# Altium PCB PCB.PcbDoc (part 6 of 9)
Units mil, origin at the board's own origin, x right, y up, seen from the top; angles counter-clockwise.
Board outline 4330.71 x 3149.61 mil, 8 copper layers (L1_TOP, L2_GND, L3_SIG, L4_PWR, L5_PWR, L6_SIG, L7_GND, L8_BOT), stack 62.406 mil thick; 660 components, 433 nets, 2602 pads, 1254 vias.
Unrouted connection lines stored in the file: 930.
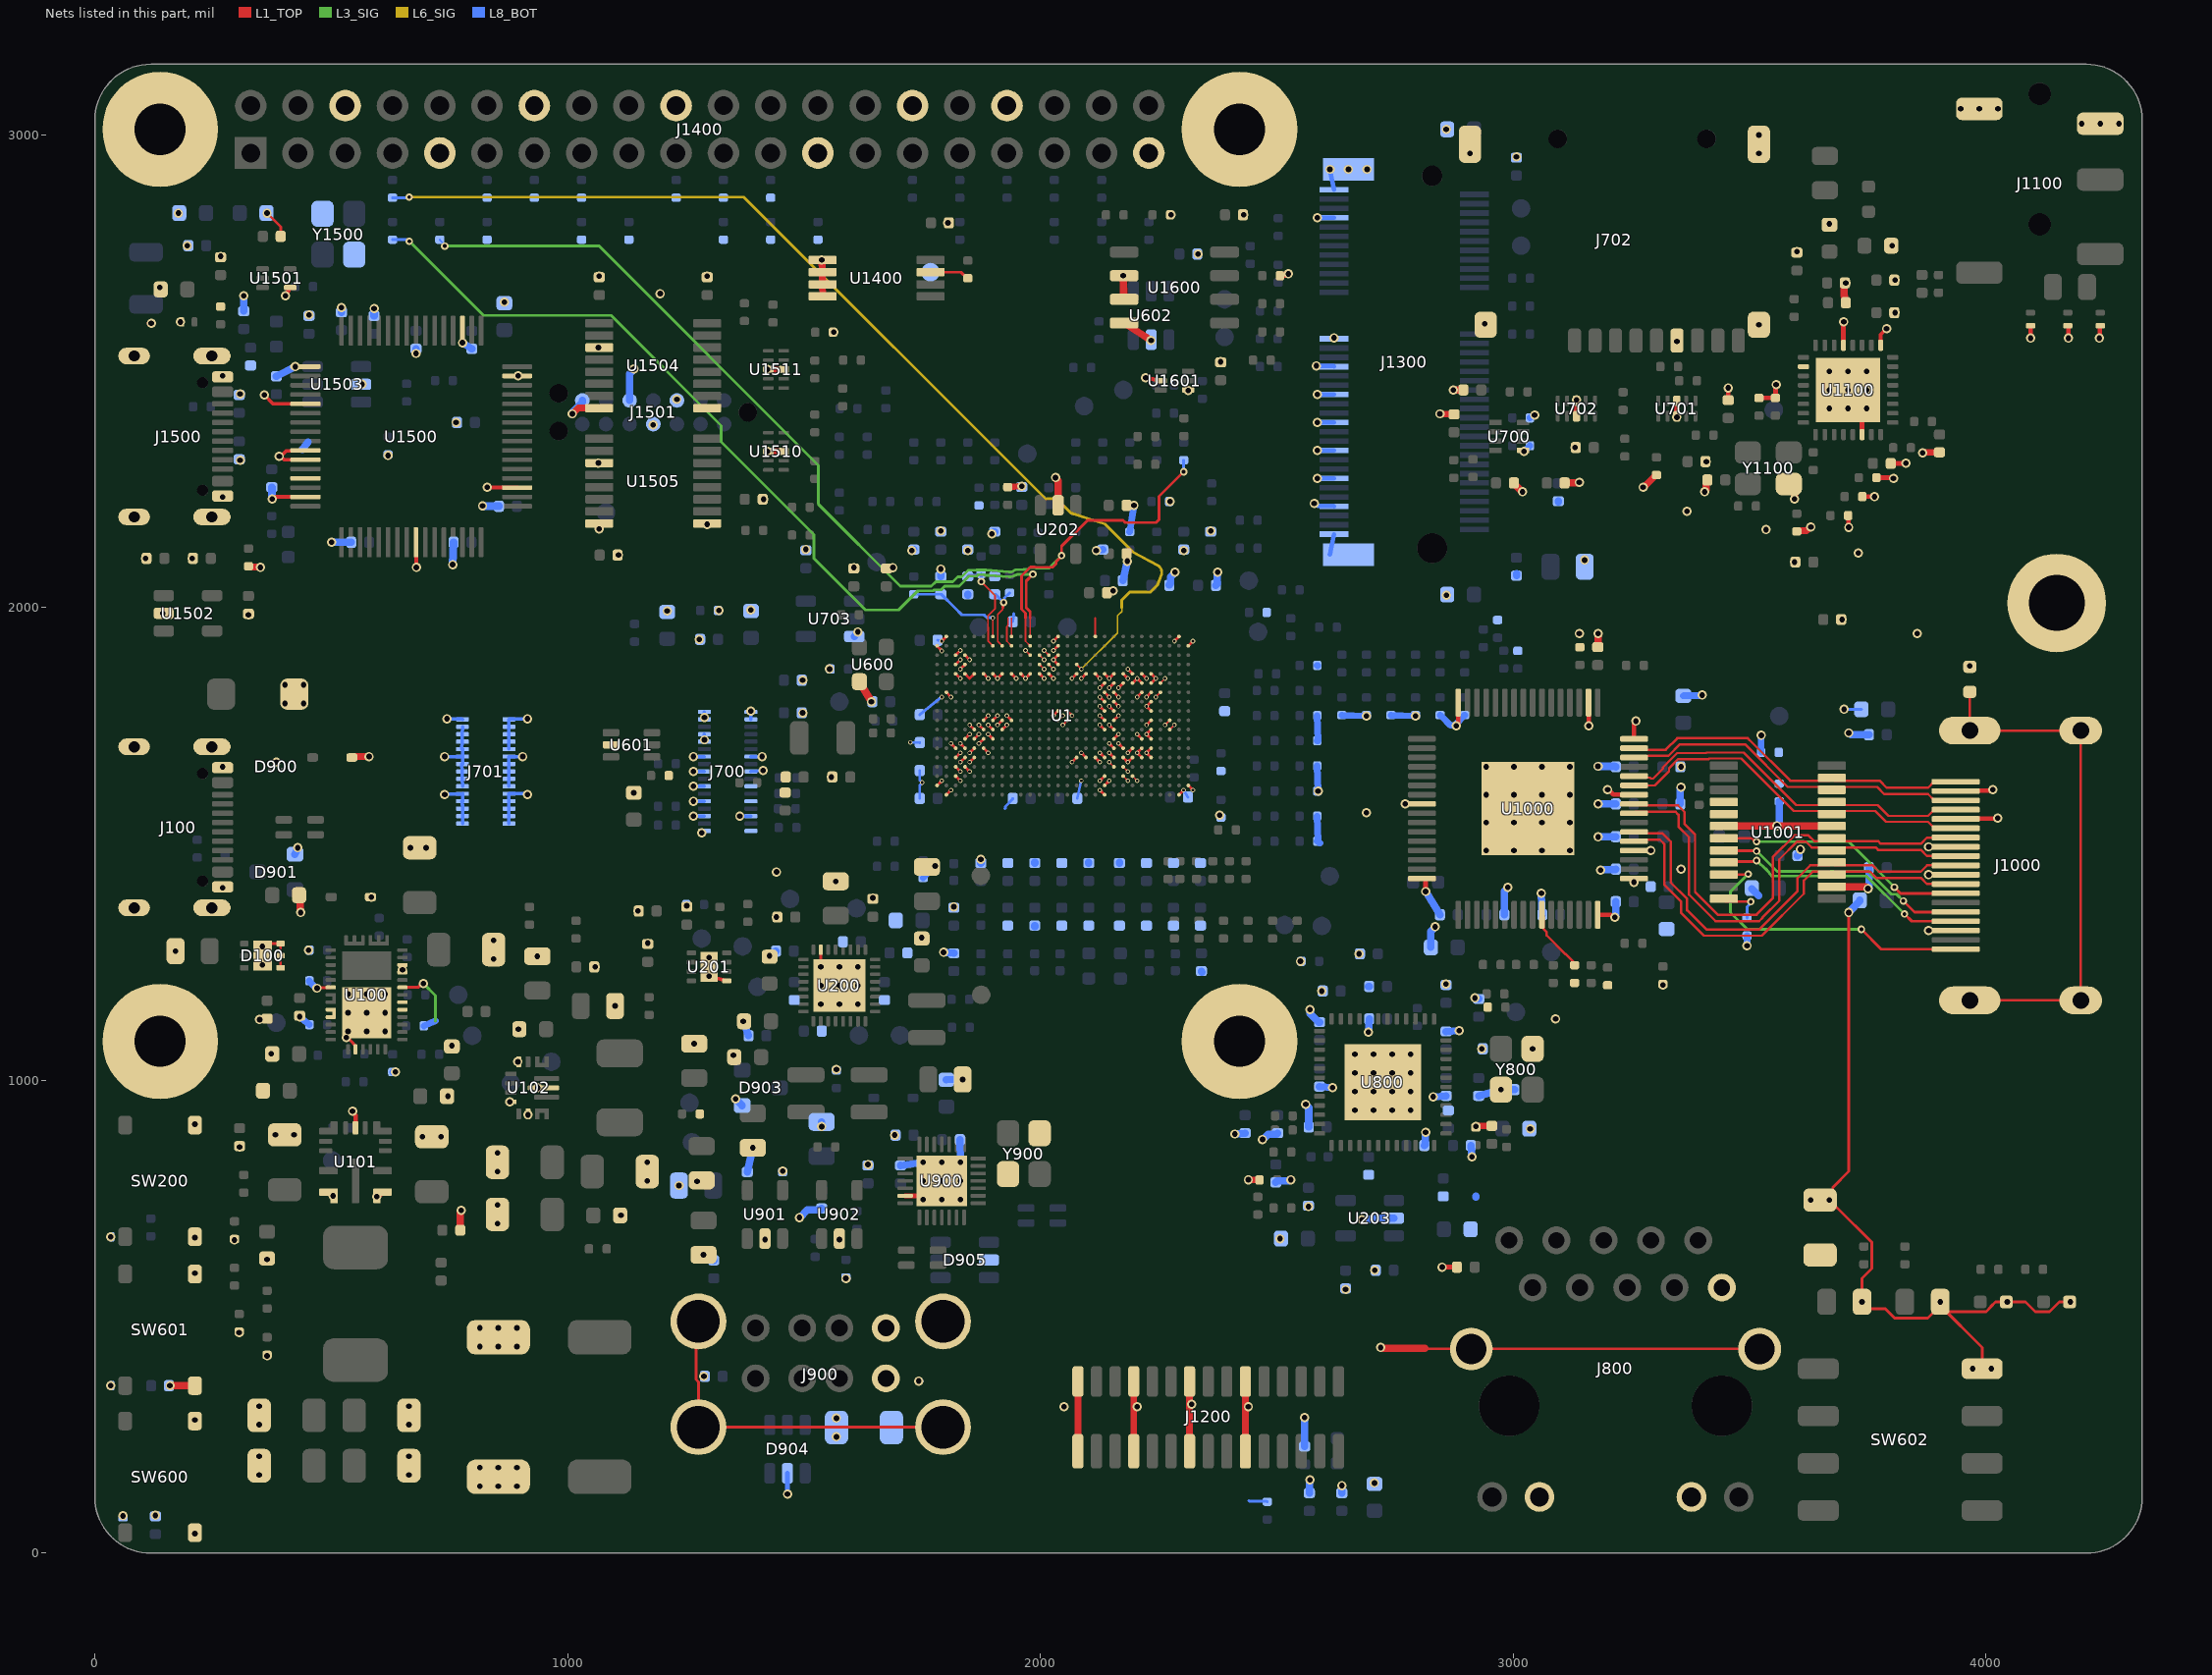
[diagram p9: the nets of this part, all layers, seen from the top]

## Via types
v1: diameter 19.68, hole 11.81, L1_TOP to L8_BOT, 865 vias
v2: diameter 9.84, hole 5.91, L1_TOP to L8_BOT, 246 vias
v3: diameter 15.75, hole 7.87, L1_TOP to L8_BOT, 125 vias
v4: diameter 13.78, hole 7.87, L1_TOP to L8_BOT, 18 vias

## Nets (pads, with @x,y where several pads share a name; then routed paths per layer and width w, separated by ;. In a path a pad name is that pad's centre, name@x,y a point inside that pad or via, vN(x,y) a via of type N, cw(c..) or ccw(c..) an arc to the next point about the centre after c; other vN are vias at no path point) (continued)
GND: C100.2 C101.2 C102.2 C103.2 C104.2 C105.2 C106.2 C107.2 C108.2 C109.2 C110.2 C111.2 C112.2 C113.2 C114.2 C117.2 C118.2 C119.2 C120.2 C121.2 C122.2 C123.2 C124.2 C125.2 C126.2 C127.2 C128.2 C200.2 C201.2 C202.2 C203.2 C204.2 C205.2 C206.2 C207.2 C208.2 C209.2 C210.2 C211.2 C212.2 C213.2 C214.2 C215.2 C216.2 C217.2 C218.2 C219.2 C220.2 C221.2 C222.2 C223.2 C224.2 C225.2 C226.2 C227.2 C228.2 C300.2 C301.2 C302.2 C303.2 C304.2 C305.2 C306.2 C307.2 C308.2 C309.2 C310.2 C311.2 C312.2 C313.2 C314.2 C315.2 C316.2 C317.2 C318.2 C319.2 C320.2 C321.2 C322.2 C323.2 C324.2 C325.2 C326.2 C327.2 C328.2 C329.2 C330.2 C331.2 C332.2 C333.2 C334.2 C335.2 C339.2 C358.2 C359.2 C360.2 C600.2 C601.2 C602.2 C603.2 C604.2 C605.2 C606.2 C607.2 C608.2 C609.2 C700.2 C701.2 C702.2 C703.2 C704.2 C705.2 C710.2 C711.2 C712.2 C713.2 C714.2 C715.2 C800.2 C801.2 C802.2 C803.2 C804.2 C805.2 C806.2 C807.2 C808.2 C809.2 C810.2 C811.2 C812.2 C813.2 C814.2 C815.2 C816.2 C817.2 C818.2 C819.2 C820.2 C821.2 C822.2 C823.2 C824.2 C825.2 C826.2 C830.2 C831.1 C831.2 C900.2 C901.2 C902.2 C903.2 C904.2 C905.2 C906.2 C907.2 C908.2 C909.2 C910.2 C911.2 C912.2 C913.1 C913.2 C1000.2 C1001.2 C1002.2 C1003.2 C1004.2 C1005.2 C1006.2 C1007.2 C1008.2 C1009.2 C1010.2 C1011.2 C1012.2 C1013.2 C1014.2 C1015.2 C1016.2 C1017.2 C1018.2 C1019.2 C1020.2 C1100.2 C1101.2 C1102.2 C1103.2 C1104.2 C1105.2 C1106.2 C1107.2 C1108.2 C1109.2 C1110.2 C1114.2 C1115.2 C1200.2 C1201.2 C1202.2 C1203.2 C1300.2 C1301.2 C1302.2 C1303.2 C1304.2 C1305.2 C1400.2 C1401.2 C1402.2 C1403.2 C1404.2 C1405.2 C1406.2 C1407.2 C1500.2 C1501.2 C1502.2 C1503.2 C1504.2 C1505.2 C1506.2 C1507.2 C1508.2 C1509.2 C1510.2 C1511.2 C1512.2 C1513.2 C1514.2 C1515.2 C1516.2 C1517.2 C1518.2 C1519.2 C1520.2 C1521.2 C1522.2 C1523.2 C1524.2 C1525.2 C1600.2 C1601.2 D100.1 D100.2 D100.3 D100.7 D101.2 D102.2 D103.1 D200.2 D600.2 D601.2 D900.1 D901.1 D903.1 D904.2 D905.2 D1100.2 D1101.2 D1102.2 D1500.2 FB1003.2 H1300.1 H1600.1 H1601.1 H1602.1 H1603.1 J100.A1B12 J100.B1A12 J100.S1 J100.S2 J100.S3 J100.S4 J700.1 J700.3 J700.5 J700.7 J700.9 J700.11 J700.13 J700.14 J700.16 J700.17 J700.18 J700.19 J700.24 J700.26 J700.28 J700.30 J700.32 J700.34 J701.1 J701.2 J701.3 J701.4 J701.5 J701.6 J701.7 J701.8 J701.9 J701.10 J701.11 J701.12 J701.13 J701.14 J701.15 J701.16 J701.17 J701.18 J701.19 J701.20 J701.21 J701.22 J701.23 J701.24 J701.25 J701.26 J701.27 J701.28 J701.29 J701.30 J702.6 J702.10 J702.11 J702.12 J702.13 J800.10 J800.12 J800.13 J800.15 J800.16 J900.4 J900.8 J900.9 J900.10 J900.11 J900.12 J1000.2 J1000.5 J1000.8 J1000.11 J1000.17 J1100.4 J1100.5 J1200.1 J1200.4 J1200.7 J1200.10 J1300.1 J1300.7 J1300.33 J1300.39 J1300.45 J1300.51 J1300.57 J1300.63 J1300.69 J1300.75 J1300.76 J1300.77 J1400.6 J1400.9 J1400.14 J1400.20 J1400.25 J1400.30 J1400.34 J1400.39 J1500.A1B12 J1500.B1A12 J1500.S1 J1500.S2 J1500.S3 J1500.S4 J1501.4 J1501.8 J1501.10 J1501.12 LED1600.2 LED1601.2 LED1602.2 LED1603.2 R101.2 R103.2 R104.2 R105.2 R106.2 R114.2 R115.2 R118.2 R124.2 R206.2 R302.2 R606.2 R611.2 R612.2 R613.2 R621.2 R623.2 R625.2 R627.2 R629.2 R631.2 R633.2 R635.2 R637.2 R639.2 R641.2 R643.2 R645.2 R647.2 R649.2 R712.2 R713.2 R732.2 R812.2 R821.2 R823.2 R904.2 R905.2 R906.2 R907.2 R912.2 R913.2 R1001.2 R1003.2 R1004.2 R1005.2 R1006.2 R1009.2 R1010.2 R1011.2 R1107.2 R1108.2 R1109.2 R1110.2 R1111.2 R1112.2 R1202.2 R1310.2 R1312.2 R1315.2 R1500.2 R1501.2 R1503.2 R1528.2 R1601.2 R1602.2 SW200.3 SW200.4 SW600.3 SW600.4 SW601.3 SW601.4 SW602.4 U1.A2 U1.A14 U1.A27 U1.B1 U1.B14 U1.B28 U1.C3 U1.C4 U1.C14 U1.D3 U1.D4 U1.D14 U1.E3 U1.E4 U1.E5 U1.E6 U1.E7 U1.E8 U1.E9 U1.E10 U1.E11 U1.E12 U1.E13 U1.E16 U1.E17 U1.E18 U1.E19 U1.E20 U1.E21 U1.E22 U1.E23 U1.E24 U1.F19 U1.F20 U1.F21 U1.F22 U1.F23 U1.F24 U1.G2 U1.G19 U1.G20 U1.G23 U1.G24 U1.H19 U1.H20 U1.H24 U1.J14 U1.J15 U1.J19 U1.J20 U1.J24 U1.K6 U1.K7 U1.K8 U1.K9 U1.K14 U1.K15 U1.K19 U1.K20 U1.K24 U1.L5 U1.L6 U1.L7 U1.L8 U1.L19 U1.L20 U1.L24 U1.M4 U1.M5 U1.M6 U1.M7 U1.M20 U1.M23 U1.M24 U1.N3 U1.N4 U1.N5 U1.N6 U1.N20 U1.N21 U1.N22 U1.N23 U1.N24 U1.P3 U1.P4 U1.P5 U1.P16 U1.P17 U1.P18 U1.P19 U1.P20 U1.P21 U1.P22 U1.P23 U1.P24 U1.R3 U1.R4 U1.T3 U1.T19 U1.U1 U1.U19 U1.U28 U1.V2 U1.V19 U1.V27 U100.2 U100.11 U100.12 U100.14 U100.16 U100.17 U100.31 U100.34 U100.35 U100.39 U101.3 U101.9 U101.11 U102.4 U102.6 U102.10 U102.15 U200.15 U200.33 U201.5 U201.9 U202.2 U203.2 U600.2 U601.2 U602.2 U700.5 U701.3 U701.8 U702.3 U702.8 U703.3 U800.49 U900.27 U900.29 U901.2 U902.2 U1000.16 U1000.17 U1000.20 U1000.26 U1000.32 U1000.34 U1000.48 U1000.56 U1000.64 U1000.65 U1001.6 U1001.14 U1001.19 U1100.6 U1100.17 U1100.21 U1100.26 U1100.33 U1400.1 U1400.2 U1400.3 U1400.4 U1500.1 U1500.5 U1500.10 U1500.11 U1500.13 U1500.15 U1500.25 U1500.35 U1500.47 U1500.51 U1501.4 U1502.2 U1503.2 U1504.3 U1504.8 U1504.9 U1505.3 U1505.8 U1505.9 U1510.3 U1510.8 U1511.3 U1511.8 U1600.2 U1600.3 U1600.4 U1601.2 U1601.4 Y800.2 Y800.4 Y900.2 Y900.4 Y1100.2 Y1500.2 Y1500.4 | length 13904.6
  L1_TOP w5.12: 2813.19,433.07 2814.37,431.89 J800.15@2911.61,431.89 J800.16@3521.46,431.89
  L1_TOP w5.91: D100.7@354.33,1263.78 354.33,1272.64 371.06,1289.37 D100.3@392.72,1289.37 D100.2@392.72,1263.78 D100.1@392.72,1238.19 ; v1(364.13,2834.66) 392.91,2805.88 C1502.2@392.91,2785.43 ; J900.11@1276.77,490.16 1271.46,484.84 1271.46,367.09 1276.77,361.77 J900.9@1276.77,266.54 J900.10@1794.09,266.54 ; U1.U1@1781.5,1624.02 v2(1791.34,1633.86) ; U1.B1@1781.5,1919.29 1781.5,1918.9 1791.34,1909.06 v2(1791.34,1908.66) ; v2(1791.34,1929.13) U1.A2@1801.18,1938.98 ; U1.V2@1801.18,1604.33 v2(1811.02,1614.17) ; U1.G2@1801.18,1820.87 v2(1811.02,1811.02) ; v2(1811.02,1712.6) U1.N3@1820.87,1702.76 ; U1.T3@1820.87,1643.7 v2(1830.71,1633.86) ; U1.R3@1820.87,1663.39 v2(1830.71,1653.54) ; U1.P3@1820.87,1683.07 v2(1830.71,1692.91) ; U1.E3@1820.87,1860.24 v2(1830.71,1850.39) ; U1.D3@1820.87,1879.92 v2(1830.71,1889.76) ; U1.C3@1820.87,1899.61 v2(1830.71,1909.45) ; v2(1830.71,1673.23) U1.P4@1840.55,1683.07 ; v2(1830.71,1712.6) U1.N4@1840.55,1702.76 ; v2(1830.71,1870.08) U1.D4@1840.55,1879.92 ; U1.R4@1840.55,1663.39 v2(1850.39,1653.54) ; U1.M4@1840.55,1722.44 v2(1850.39,1732.28) ; U1.E4@1840.55,1860.24 1850.39,1850.39 U1.E5@1860.24,1860.24 ; U1.C4@1840.55,1899.61 v2(1850.39,1889.76) ; v2(1850.39,1673.23) U1.P5@1860.24,1683.07 ; v2(1850.39,1692.91) U1.N5@1860.24,1702.76 ; v2(1850.39,1751.97) U1.L5@1860.24,1742.13 ; U1.M5@1860.24,1722.44 v2(1870.08,1732.28) ; v2(1870.08,1712.6) U1.M6@1879.92,1722.44 ; v2(1870.08,1751.97) U1.L6@1879.92,1742.13 ; U1.N6@1879.92,1702.76 v2(1889.76,1692.91) ; U1.K6@1879.92,1761.81 v2(1889.76,1771.65) ; U1.E6@1879.92,1860.24 v2(1889.76,1850.39) ; v2(1889.76,1732.28) U1.M7@1899.61,1722.44 ; v2(1889.76,1751.97) U1.L7@1899.61,1742.13 ; U1.K7@1899.61,1761.81 v2(1909.45,1771.65) ; U1.E7@1899.61,1860.24 v2(1909.45,1850.39) U1.E8@1919.29,1860.24 ; v2(1909.45,1751.97) U1.K8@1919.29,1761.81 ; U1.L8@1919.29,1742.13 v2(1929.13,1751.97) ; v2(1929.13,1771.65) U1.K9@1938.98,1761.81 ; U1.E9@1938.98,1860.24 v2(1948.82,1850.39) ; U1.E10@1958.66,1860.24 v2(1968.5,1850.39) U1.E11@1978.35,1860.24 ; U1.E12@1998.03,1860.24 v2(2007.87,1850.39) ; U1.E13@2017.72,1860.24 v2(2027.56,1850.39) ; v2(2027.56,1771.65) U1.J14@2037.4,1781.5 ; v2(2027.56,1909.45) U1.B14@2037.4,1919.29 ; v2(2027.56,1929.13) U1.A14@2037.4,1938.98 ; U1.K14@2037.4,1761.81 v2(2047.24,1771.65) ; U1.D14@2037.4,1879.92 v2(2027.56,1889.76) U1.C14@2037.4,1899.61 ; v2(2047.24,1751.97) U1.K15@2057.09,1761.81 ; U1.J15@2057.09,1781.5 v2(2066.93,1771.65) ; v2(2066.93,1673.23) U1.P16@2076.77,1683.07 ; v2(2066.93,1850.39) U1.E16@2076.77,1860.24 ; v2(2086.61,1692.91) U1.P17@2096.46,1683.07 ; v2(2086.61,1850.39) U1.E17@2096.46,1860.24 ; U1.P18@2116.14,1683.07 v2(2125.98,1673.23) ; U1.E18@2116.14,1860.24 v2(2125.98,1850.39) ; v2(2125.98,1614.17) U1.V19@2135.83,1604.33 ; v2(2125.98,1633.86) U1.T19@2135.83,1643.7 ; v2(2125.98,1692.91) U1.P19@2135.83,1683.07 ; v2(2125.98,1751.97) U1.L19@2135.83,1742.13 ; v2(2125.98,1771.65) U1.K19@2135.83,1761.81 ; v2(2125.98,1791.34) U1.J19@2135.83,1781.5 ; v2(2125.98,1811.02) U1.H19@2135.83,1801.18 ; v2(2125.98,1830.71) U1.F19@2135.83,1840.55 ; U1.U19@2135.83,1624.02 v2(2145.67,1633.86) ; U1.G19@2135.83,1820.87 v2(2145.67,1811.02) ; U1.E19@2135.83,1860.24 v2(2145.67,1850.39) U1.E20@2155.51,1860.24 ; v2(2145.67,1692.91) U1.P20@2155.51,1683.07 ; v2(2145.67,1712.6) U1.N20@2155.51,1702.76 ; v2(2145.67,1751.97) U1.L20@2155.51,1742.13 ; v2(2145.67,1791.34) U1.J20@2155.51,1781.5 ; v2(2145.67,1830.71) U1.F20@2155.51,1840.55 ; U1.M20@2155.51,1722.44 v2(2165.35,1732.28) ; U1.K20@2155.51,1761.81 v2(2165.35,1771.65) ; U1.H20@2155.51,1801.18 v2(2165.35,1791.34) ; U1.G20@2155.51,1820.87 v2(2165.35,1811.02) ; v2(2165.35,1712.6) U1.N21@2175.2,1702.76 ; v2(2165.35,1830.71) U1.F21@2175.2,1840.55 ; U1.P21@2175.2,1683.07 v2(2185.04,1673.23) U1.P22@2194.88,1683.07 ; U1.E21@2175.2,1860.24 v2(2185.04,1850.39) ; v2(2185.04,1692.91) U1.N22@2194.88,1702.76 ; v2(2185.04,1870.08) U1.E22@2194.88,1860.24 ; U1.F22@2194.88,1840.55 v2(2204.72,1850.39) U1.F23@2214.57,1840.55 ; v2(2204.72,1732.28) U1.M23@2214.57,1722.44 ; v2(2204.72,1811.02) U1.G23@2214.57,1820.87 ; U1.P23@2214.57,1683.07 v2(2204.72,1692.91) U1.N23@2214.57,1702.76 ; U1.E23@2214.57,1860.24 v2(2224.41,1850.39) ; v2(2224.41,1751.97) U1.K24@2234.25,1761.81 ; v2(2224.41,1811.02) U1.G24@2234.25,1820.87 ; U1.P24@2234.25,1683.07 v2(2224.41,1692.91) U1.N24@2234.25,1702.76 ; U1.M24@2234.25,1722.44 v2(2224.41,1732.28) U1.L24@2234.25,1742.13 ; U1.J24@2234.25,1781.5 v2(2224.41,1791.34) U1.H24@2234.25,1801.18 ; U1.F24@2234.25,1840.55 v2(2244.09,1850.39) U1.E24@2234.25,1860.24 ; v2(2283.46,1929.13) U1.A27@2293.31,1938.98 ; U1.V27@2293.31,1604.33 v2(2303.15,1614.17) ; U1.U28@2312.99,1624.02 v2(2322.83,1614.17) ; U1.B28@2312.99,1919.29 v2(2322.83,1929.13) ; v1(3710,1355) 3710,807.64 3676.12,773.76 3676.12,767.99 3655.18,747.05 C831.2@3649.41,747.05 3665.29,731.17 3685.43,731.17 3758.86,657.74 3758.86,602.1 3738.19,581.43 v1(3738.19,531.5) 3752.95,516.73 3787.32,516.73 3807,497.05 3876.97,497.05 3903.54,523.62 3992.13,435.04 SW602.4@3992.13,390.16 ; v1(3903.54,531.5) 3903.54,527.35 3920.07,510.83 4000.79,510.83 4010.73,520.77 4010.73,521.55 4020.67,531.5 v1(4045.28,531.5) 4083.9,531.5 4104.57,510.83 4134.64,510.83 4155.31,531.5 v1(4179.13,531.5)
  L1_TOP w6.3: D900.1@383.86,1669.29 v1(383.86,1673.23) ; v1(470,1195) 471.06,1196.06 498.23,1196.06 U100.31@499.02,1196.85 ; v1(531.57,1090.44) 534.57,1090.44 546.46,1078.55 546.46,1077.56 550.39,1073.62 550.39,1066.73 U100.2@551.18,1065.94 ; U100.14@650.59,1196.85 683.5,1196.85 691.38,1204.72 v1(695,1204.72) ; U100.16@650.59,1228.35 v1(650.59,1234.25) U100.17@650.59,1244.09 ; v1(1535.43,1240.16) U200.15@1535.43,1276.57
  L1_TOP w7.87: v1(358.27,2450) 377.17,2431.1 U1500.5@445.37,2431.1 ; v1(375,2230) 378.2,2230 382.45,2234.25 U1500.15@445.37,2234.25 ; v1(390,2320) v1@393.2,2320 ; v1(423.7,2509.84) U1500.1@445.37,2509.84 ; U1500.11@445.37,2312.99 400.2,2312.99 v1@393.2,2320 ; U1500.10@445.37,2332.68 444.39,2331.69 404.89,2331.69 v1@393.2,2320 ; U1500.25@679.13,2138.29 679.57,2137.85 679.57,2085.43 v1(680,2085) ; v1(777.56,2560.51) U1500.51@777.56,2586.12 ; v1(830,2255) 830.53,2254.47 892.68,2254.47 U1500.35@893.21,2253.94 ; v1(877.95,954.72) U102.4@879.92,954.72 ; U1500.47@893.21,2490.16 v1(895.2,2490.16) ; v1(894.68,1039.37) U102.15@896.65,1039.37 ; v1(916.34,927.17) U102.6@916.34,929.13 ; v1(937.01,984.25) U102.10@948.82,984.25 ; v1(1299.21,1220.47) U201.5@1336.61,1210.63 ; U1100.17@3777.56,2555.12 3777.56,2577.56 v1(3790,2590)
  L1_TOP w9.45: v1(181.1,2604.33) D1500.2@183.07,2604.33 ; v1(403.15,2659.45) U1501.4@412.99,2677.16 ; v1(545,935) 545,932.23 551.18,926.05 U101.3@551.18,899.61 ; v1(2222.83,2486.22) U1601.2@2254.33,2480.32 ; U1601.4@2312.6,2460.63 v1(2313.02,2459.11) ; v1(2771.65,1584.65) U1000.56@2807.09,1584.65 ; v1(2880,1750) 2880,1752.77 2883.86,1756.63 U1000.48@2883.86,1799.21 ; U700.5@3021.26,2332.68 v1(3023.23,2330.71) ; U1000.34@3159.45,1799.21 3159.72,1798.94 3159.72,1750.28 v1(3160,1750) ; U1000.16@3179.13,1350.39 3206.84,1350.39 3212.23,1345 v1(3215,1345) ; v1(3200,1615) 3201.54,1615 3212.2,1604.33 U1000.26@3255.91,1604.33 ; v1(3255.91,1419.29) U1000.17@3255.91,1427.17 ; U1000.20@3255.91,1486.22 v1(3291.34,1486.22) ; U1000.32@3255.91,1722.44 3255.91,1753.14 3260,1757.23 v1(3260,1760) ; v1(3879.13,1316.93) J1000.17@3936.22,1316.93 ; v1(3879.13,1435.04) J1000.11@3936.22,1435.04 ; v1(3879.13,1494.09) J1000.8@3936.22,1494.09 ; J1000.5@3936.22,1553.15 3937.15,1554.07 4024.07,1554.07 v1(4025,1555) ; J1000.2@3936.22,1612.2 3937.4,1613.39 4013.39,1613.39 v1(4015,1615) ; D1102.2@4094.49,2596.46 4094.74,2596.2 4094.74,2570.26 v1(4095,2570) ; D1101.2@4173.23,2596.46 4173.82,2596.46 4175,2595.28 v1(4175,2570) ; v1(4240,2570) 4241.06,2571.06 4241.06,2595.39 D1100.2@4242.13,2596.46
  L1_TOP w10: U900.27@1714.08,755.91 1744.09,755.91 v1(1751.97,748.03) ; U1000.64@2807.09,1427.17 2814.06,1427.17 2814.96,1426.26 v1(2814.96,1399.61) ; v1(2850,605) C830.2@2881.1,605 ; C1109.2@3455,2438.9 v1(3455,2465) ; R1107.2@3520,2443.7 R1108.2@3555,2443.7 3555,2470.36 v1(3556.5,2471.87) ; U1100.21@3698.82,2555.12 3698.82,2598.82 3700,2600 3700,2604.47 v1(3699.53,2604.95) ; v1(3708.66,2460.63) 3738.19,2431.1 U1100.6@3738.19,2366.14 ; R1110.2@3708.7,2195 3709.35,2194.35 3709.35,2170.65 v1(3710,2170) ; R1111.2@3738.7,2235 3763.84,2235 v1(3764.22,2234.61) ; R1112.2@3768.7,2275 3803.22,2275 v1(3804.63,2273.59) ; C1107.2@3798.9,2305 3830.34,2305 v1(3830.67,2305.33)
  L1_TOP w12.6: U101.9@494.09,763.78 v1(503.94,755.91) U101.9@505.91,755.91 ; U101.11@596.46,755.91 v1(596.46,753.94) 597.42,754.74 U101.11@608.27,763.78 ; v1(1422.56,2330.71) U1510.8@1457.38,2330.71 ; v1(1422.56,2503.94) U1511.3@1424.51,2503.94 U1511.8@1457.38,2503.94 ; v1(2845,2410) 2845.55,2409.45 2874.45,2409.45 C710.2@2875,2408.9 ; v1(3130.91,2338.58) C713.2@3133.37,2341.04 ; U702.8@3133.37,2404.33 U702.8@3133.86,2404.82 ; U702.8@3133.86,2404.82 v1(3133.86,2439.65) ; v1(3346.46,2402.87) U701.8@3346.46,2437.7
  L1_TOP w14.17: v1@117.13,2601.38 v1(119.09,2601.38) ; v1(295.28,662.4) R118.2@295.28,664.37 ; v1(305.12,466.54) R114.2@305.12,468.5 ; R1501.2@324.8,2087.6 326.35,2086.05 348.95,2086.05 v1(350,2085) ; v1(364.17,417.32) R115.2@364.17,419.29 ; D101.2@543.5,1683.07 545.28,1684.84 551.58,1684.84 551.73,1685 v1(580,1685) ; D102.2@582.87,1387.8 v1(584.84,1387.8) ; v1(1010,2410) 1022.24,2422.24 U1504.8@1066.93,2422.24 ; v1(1064.96,2306.1) U1505.3@1066.93,2306.1 ; v1(1064.96,2550.2) U1504.3@1066.93,2550.2 ; v1(1066.93,2166.34) U1505.8@1066.93,2178.15 ; v1(1195.87,2664.37) v1@1197.83,2664.37 ; v1(1295.28,2176.18) U1505.9@1295.28,2178.15 ; v1@1439.96,1440.94 v1(1441.93,1440.94) ; U1400.4@1539.37,2658.46 1538.71,2684.04 1538.06,2709.61 v1(1537.4,2735.24) v1(1537.4,2735.24) ; U1400.3@1539.37,2684.05 1538.39,2709.61 v1(1537.4,2735.24) v1(1537.4,2735.24) ; U1400.2@1539.37,2709.65 1537.41,2735.09 v1(1537.4,2735.24) ; U1400.1@1539.37,2735.24 v1(1537.4,2735.24) ; R1528.2@1561.34,2582.68 v1(1563.31,2582.68) ; R206.2@1931.1,2254.92 v1(1960.63,2257.09) ; J1200.1@2079.41,215.43 J1200.1@2079.41,363.07 ; J1200.4@2197.52,215.43 J1200.4@2197.52,363.07 ; R1601.2@2274.61,2830.91 v1(2276.57,2830.91) ; J1200.7@2315.63,215.43 J1200.7@2315.63,363.07 ; J1200.10@2433.74,215.43 J1200.10@2433.74,363.07 ; v1(2440,790) 2440.32,789.68 2463.27,789.68 R823.2@2463.58,789.37 ; R1602.2@2506.89,2702.16 v1(2524.61,2706.1) ; v1(2921.26,902.56) 2922.6,903.9 C802.2@2955,903.9 ; v1(3275,2255) 3276.05,2256.05 3277.9,2256.05 3302.36,2280.51 R732.2@3303.35,2280.51 ; v1(3316.93,1201.77) R1003.2@3316.93,1203.74 ; v1(3368.11,2203.74) v1@3368.11,2205.71 ; R1109.2@3600,2161.3 3601.77,2163.07 3620.95,2163.07 3628.51,2170.63 v1(3630,2170.63) ; v1@3630,2172.6 v1(3630,2170.63) ; v1@3630.07,2170.63 v1(3630,2170.63) ; v1(3730,2115.63) v1@3730,2117.6 ; v1@3866.14,2325.59 3867.63,2325.59 3870.62,2328.58 C1108.2@3901.97,2328.58
  L1_TOP w15.75: v1(107.09,2104.33) C1503.2@109.06,2104.33 ; v1(137.01,2677.17) C1500.2@138.98,2673.23 ; v1(143.7,1988.19) U1502.2@145.67,1988.19 ; v1(158.66,354.33) SW601.3@211.61,354.33 ; v1(205.51,2104.33) C1505.2@207.48,2104.33 ; v1(211.61,41.34) SW600.3@211.61,43.31 ; SW600.4@211.61,279.53 v1(211.61,281.5) ; SW601.4@211.61,590.55 v1(211.61,592.52) ; v1(211.61,667.32) SW200.3@211.61,669.29 ; SW200.4@211.61,905.51 v1(211.61,907.48) ; C1501.2@265.75,2741.34 v1(265.75,2743.31) ; v1(270.08,1407.48) J100.B1A12@270.08,1409.45 ; J100.A1B12@270.08,1661.42 v1(270.08,1663.39) ; v1(270.08,2234.25) J1500.B1A12@270.08,2236.22 ; J1500.A1B12@270.08,2488.19 v1(270.08,2490.16) ; v1(306.1,859.06) C113.2@306.1,861.02 ; v1(324.8,1985.04) C1504.2@324.8,1987.01 ; v1(348.43,1128.74) C103.2@364.17,1130.71 ; v1(364.17,621.26) C110.2@364.17,623.23 ; v1(373.23,1056.1) C105.2@375.2,1056.1 ; C101.2@431.89,1391.73 434.25,1389.38 434.25,1355.75 v1(435,1355) ; v1(433.07,1134.65) C102.2@433.07,1136.61 ; C112.2@744.88,966.54 v1(746.85,966.54) ; C106.2@755,1071.69 v1(755,1073.66) ; C114.2@772.83,683.07 772.83,721.77 775,723.93 v1(775,725) ; v1(895.87,1108.27) C123.2@897.83,1108.27 ; C124.2@1056.3,1240.16 v1(1058.27,1240.16) ; C1522.2@1066.93,2699.02 v1(1066.93,2700.98) ; C1524.2@1105.51,2111.22 v1(1107.48,2111.22) ; C128.2@1111.02,714.57 v1(1112.99,714.57) ; v1(1148.43,1358.27) C221.2@1150.39,1358.27 ; C224.2@1169.29,1288.58 v1(1169.29,1290.55) ; C222.2@1251.97,1367.32 v1(1251.97,1369.29) ; v1(1273.62,786.61) C213.2@1283.47,788.58 ; C1523.2@1295.28,2699.02 v1(1295.28,2700.98) ; v1(1350.59,1053.15) C207.2@1352.56,1049.21 ; v1(1371.26,1125) C202.2@1373.23,1125 ; C1525.2@1412.6,2229.33 v1(1414.57,2229.33) ; v1(1417.32,663.39) U901.2@1417.32,665.35 ; C203.2@1427.16,1261.61 v1(1427.17,1263.58) ; v1(1441.73,1345.47) C208.2@1443.7,1345.47 ; v1(1557.87,1641.73) C602.2@1559.84,1641.73 ; v1(1574.8,663.39) U902.2@1574.8,665.35 ; C601.2@1605.32,2082.87 v1(1605.32,2084.84) ; U600.2@1617.13,1843.5 v1(1642.52,1801.18) ; C204.2@1645.67,1384.05 v1(1645.67,1386.02) ; C600.2@1674.21,2082.87 v1(1687.99,2084.84) ; C200.2@1749.02,1300 v1(1749.02,1301.97) ; C211.2@1759.84,1451.57 v1(1777.56,1453.54) ; v1(1804.33,2813.98) C1404.2@1806.3,2813.98 ; v1(2032.02,2275.04) 2032.02,2273.97 2037.4,2268.59 2037.4,2222.44 U202.2@2039.96,2219.88 ; C300.2@2140.94,2031.5 2140.94,2032.24 2143.7,2034.99 2153.19,2034.99 v1(2153.94,2035.75) ; U1600.4@2177.17,2602.16 v1(2234.25,2564.96) ; U1600.3@2177.17,2652.16 2175.2,2702.09 v1(2175.2,2702.17) U1600.2@2177.17,2702.16 ; C226.2@2182.28,2114.17 v1(2184.25,2098.43) ; C225.2@2182.28,2216.53 v1(2198.03,2216.54) ; C1601.2@2381.5,2518.9 v1(2381.5,2520.16) ; C1600.2@2428.35,2830.91 v1(2430.32,2830.91) ; v1(2720,435) 2721.07,435 2722.99,433.07 2813.19,433.07 ; v1(2873.23,2460.63) C712.2@2894.88,2460.63 ; v1(2939.96,2600.39) J702.11@2941.93,2598.43 ; C711.2@3001.57,2263.78 3001.57,2262.6 3019.17,2245 v1(3020,2245) ; C715.2@3109.05,2263.78 3109.67,2264.39 3139.39,2264.39 v1(3140,2265) ; C1004.2@3179.13,1916.54 3179.57,1916.97 3179.57,1944.57 v1(3180,1945) ; v1(3346.65,2562.99) J702.6@3346.65,2564.96 ; v1(3405,2245) 3405,2246.07 3408.35,2249.41 3408.35,2267.24 C1110.2@3411.1,2270 ; C714.2@3406.89,2309.05 v1(3408.86,2309.06) ; U1001.6@3445.83,1537.8 v1@3559.17,1537.8 ; v1(3558.33,1538.64) v1@3559.17,1537.8 ; Y1100.2@3583.31,2261.54 3595,2249.84 v1(3595,2230) ; v1(3595.28,2096.46) C1115.2@3597.24,2096.46 ; C1104.2@3600.39,2751.18 v1(3600.39,2753.15) ; C1106.2@3669.29,2809.84 v1(3669.29,2811.81) ; U1001.14@3674.17,1409.84 3745.46,1409.84 3749.62,1405.69 v1(3750.69,1405.69) ; U1001.19@3674.17,1537.8 v1@3559.17,1537.8 ; C1114.2@3693.9,1975 v1(3695.87,1975) ; C1101.2@3703.9,2645 3701.14,2647.76 3701.14,2658.86 3700,2660 3700,2683.07 v1(3703.94,2687.01) ; C1100.2@3800,2765.75 v1(3801.97,2765.75) ; C1103.2@3806.3,2624.02 v1(3808.27,2624.02) ; C1105.2@3806.3,2692.91 v1(3808.27,2692.91) ; v1@3866.14,2325.59 v1(3866.14,2327.56) ; FB1003.2@3966.14,1875 v1(3966.14,1876.97)
  L3_SIG w5.91: v1(695,1204.72) 720.47,1179.25 720.47,1125.79
  L8_BOT w5.91: v2(1725,1715) 1725.22,1714.78 1744.67,1714.78 C319.2@1744.88,1714.57 ; C339.2@1744.88,1596.46 1744.88,1623.82 1750,1628.93 v2(1750,1630) 1750,1630.16 1744.88,1635.28 C318.2@1744.88,1655.51 ; C320.2@1744.88,1773.62 v2(1791.34,1811.02) ; C313.2@1782.68,1931.1 v2(1791.34,1929.13) ; 1925,1575 1925.75,1575.75 1925.75,1579.3 1941.73,1595.28 C302.2@1941.73,1596.46 ; C329.2@1941.73,1970.47 1943.6,1987.28 ; C303.2@2077.95,1596.46 v2(2086.61,1633.86) ; v2(2303.15,1614.17) C315.2@2312.2,1599.21 ; v1(2379.2,1561.02) 2381.89,1558.33 R912.2@2381.89,1556.1 ; 2440.94,111.22 2442.2,109.96 2478.74,109.96 R1202.2@2480,108.7 ; v1(3700,1785) C1016.2@3736.65,1785
  L8_BOT w7.24: v1(740,1605) 740.94,1605.94 777.21,1605.94 J701.5@777.56,1606.3 J701.4@777.56,1590.55 777.13,1590.55 J701.4@777.07,1590.49 ; v1(740,1685) J701.10@777.52,1685 ; v1(745,1765) 745.61,1764.39 776.95,1764.39 J701.15@777.56,1763.78 ; J701.9@776.08,1669.24 776.58,1653.51 777.07,1637.78 J701.6@777.56,1622.05 ; J701.11@776.08,1700.83 776.58,1716.57 777.07,1732.3 J701.14@777.56,1748.03 ; J701.4@776.22,1589.65 J701.4@777.07,1590.49 ; 776.81,1582.46 J701.4@777.07,1590.49 ; J701.4@777.07,1590.57 J701.4@777.07,1590.49 ; J701.1@777.56,1543.31 J701.2@777.56,1559.05 J701.3@777.56,1574.8 ; J701.3@777.56,1574.8 777.56,1582.44 ; J701.9@777.56,1669.29 J701.10@777.56,1685.04 J701.10@777.52,1685 ; J701.11@777.56,1700.79 J701.10@777.56,1685.04 J701.10@777.52,1685 ; J701.30@875.98,1543.31 J701.27@875.98,1590.55 J701.26@875.98,1606.3 913.7,1606.3 v1(915,1605) ; J701.25@875.98,1622.05 J701.23@875.98,1653.54 J701.22@875.98,1669.29 J701.21@875.98,1685.04 ; J701.21@875.98,1685.04 v1(905,1685) ; J701.20@875.98,1700.79 J701.17@875.98,1748.03 J701.16@875.98,1763.78 876.89,1764.68 893.98,1764.68 894.29,1765 v1(915,1765) ; v1(1265.75,1559.06) J700.3@1289.37,1559.05 ; v1(1265.75,1590.55) J700.5@1289.37,1590.55 ; v1(1265.75,1622.05) J700.7@1289.37,1622.05 ; v1(1265.75,1653.54) J700.9@1289.37,1653.54 ; v1(1265.75,1685.04) J700.11@1289.37,1685.04 ; v1(1283.46,1523.62) J700.1@1289.37,1527.56 ; J700.13@1289.37,1716.54 v1(1289.37,1720.47) J700.14@1289.37,1732.28 ; J700.16@1289.37,1763.78 v1(1289.37,1767.72) J700.17@1289.37,1779.53 ; v1(1364.17,1559.06) J700.32@1387.8,1559.05 ; J700.26@1387.8,1653.54 v1(1413.39,1655.51) ; J700.24@1387.8,1685.04 v1(1411.42,1685.04) ; J700.19@1387.8,1763.78 v1(1387.8,1781.5)
  L8_BOT w9.45: v1(33.46,354.33) D601.2@35.43,354.33 ; v1(33.46,669.29) D200.2@35.43,669.29 ; D600.2@59.06,72.83 v1(59.06,78.74) ; v1(2579.26,2220.74) 2582.03,2220.74 2587.02,2215.75 2620.08,2215.75 J1300.69@2621.26,2214.57 ; v1(2583.78,2511.73) 2584.73,2510.79 2620.31,2510.79 J1300.39@2621.26,2509.84 ; v1(2585.83,2273.62) J1300.63@2621.26,2273.62 ; v1(2585.83,2332.68) J1300.57@2621.26,2332.68 ; v1(2585.83,2391.73) J1300.51@2621.26,2391.73 ; v1(2585.83,2450.79) J1300.45@2621.26,2450.79 ; v1(2585.83,2824.8) J1300.7@2621.26,2824.8 ; J1300.77@2612.4,2112.2 2613.98,2119.93 J1300.75@2621.26,2155.51 ; v1(2612.4,2927.17) 2613.98,2919.44 J1300.1@2621.26,2883.86 ; J1300.33@2621.26,2568.9 v1(2621.26,2570.87)
  L8_BOT w10: v1(1465,125) D904.2@1465,168.82
  L8_BOT w14.17: v1(433.07,1134.65) R106.2@453.74,1118.11 ; v1(451.77,1275.59) R104.2@453.74,1275.59 ; R105.2@453.74,1210.63 453.74,1209.65 467.33,1196.05 468.95,1196.05 v1(470,1195) ; v1(620.08,2321.85) R1503.2@620.08,2323.82 ; R101.2@629.92,1017.72 635.19,1017.72 v1(635.73,1018.25) ; R103.2@695.87,1115.16 720.47,1125.79 ; R712.2@1250.98,1372.05 v1(1251.97,1369.29) ; R713.2@1317.91,1994.09 v1(1319.88,1994.09) ; R913.2@1454.72,806.1 v1(1454.72,808.07) ; v1(1554.13,1870.08) R613.2@1556.1,1870.08 ; R906.2@1568.7,1021.14 v1(1568.7,1023.11) ; v1(1588.58,581.22) R907.2@1588.58,583.19 ; R904.2@1751.97,1428.15 v1(1777.56,1453.54) ; R1310.2@2188.98,2160.43 v1(2198.03,2216.54) ; R905.2@2272.64,2224.41 v1(2274.61,2224.41) ; v1(2550.2,1251.97) R821.2@2552.17,1251.97 ; R621.2@2585.63,1505.91 R621.2@2587.6,1505.91 ; R623.2@2585.63,1559.05 2587.6,1505.98 R621.2@2587.6,1505.91 ; R625.2@2585.63,1612.2 v1(2587.6,1612.2) 2587.6,1612.28 R645.2@2585.63,1665.35 ; R647.2@2585.63,1718.5 2587.6,1718.5 2587.6,1718.58 R649.2@2585.63,1771.65 ; R627.2@2585.63,1877.95 2586.33,1877.26 R627.2@2586.9,1877.26 ; R621.2@2591.78,1501.72 R621.2@2587.6,1505.91 ; R643.2@2637.8,1772.64 2689.69,1770.67 v1(2689.76,1770.67) R641.2@2689.76,1772.64 ; R639.2@2741.73,1772.64 2793.63,1770.67 v1(2793.7,1770.67) R637.2@2793.7,1772.64 ; R635.2@2845.67,1772.64 2847.44,1770.87 2848.42,1770.87 2868.24,1751.05 2878.95,1751.05 v1(2880,1750) 2881.05,1751.05 2881.05,1756.05 2894.88,1769.88 2894.88,1770.87 2896.65,1772.64 R633.2@2897.64,1772.64 ; v1(3023.23,2330.71) R1312.2@3035.63,2342.52 ; R1315.2@3035.63,2401.57 v1(3045.47,2407.48) ; C1010.2@3360,1813.35 3360.83,1814.17 3399.17,1814.17 v1(3400,1815) ; v1(3495,1285) R1009.2@3495,1306.3 ; R1011.2@3524.61,1693.9 3524.8,1694.09 3524.8,1729.8 v1(3525,1730)
  L8_BOT w15.75: C606.2@127.95,77.95 v1(127.95,79.92) ; C607.2@156.69,354.33 v1(158.66,354.33) ; v1(176.38,2834.65) C1405.2@178.35,2834.65 ; v1(195.67,2765.75) C1407.2@197.64,2765.75 ; C1518.2@305.12,2313.78 v1(307.09,2311.81) ; C1517.2@305.12,2450 v1(307.09,2451.97) ; C1520.2@314.96,2627.17 v1(315,2660) ; C1507.2@374.02,2254.72 374.51,2254.23 374.51,2230.49 v1(375,2230) ; C1516.2@383.86,2489.37 v1(423.7,2509.84) ; D901.1@423.23,1478.35 v1(429.13,1492.13) ; 438.98,2334.65 450.79,2350.39 ; C1519.2@452.76,2617.32 v1(452.76,2619.29) ; v1(500.79,2138.27) C1511.2@542.13,2138.27 ; C1509.2@521.65,2624.72 v1(521.65,2634.57) ; U1503.2@562.99,2472.44 v1(564.96,2472.44) ; C1521.2@590.55,2617.32 v1(590.55,2633.07) ; v1(679.13,2537.72) C1514.2@679.13,2547.56 ; v1(756.69,2091.02) C1512.2@758.66,2138.27 ; v1(764.09,2391.73) C1513.2@766.06,2391.73 ; v1(777.56,2560.51) C1510.2@797.24,2547.56 ; v1(820,2215) 820.22,2214.78 854.43,2214.78 C1508.2@854.65,2214.57 ; C1506.2@866.14,2644.02 v1(866.14,2645.98) ; v1(1010,2410) 1010.75,2410.75 1010.75,2413.91 1031.1,2434.26 J1501.8@1031.1,2438.39 ; J1501.10@1131.1,2438.39 1131.1,2495.04 1140,2503.93 v1(1140,2505) ; v1(1181.1,2386.42) J1501.4@1181.1,2388.39 ; C700.2@1210.63,1990.94 v1(1210.63,1992.91) ; J1501.12@1231.1,2438.39 v1(1231.1,2440.35) ; v1(1278.35,1933.07) C701.2@1280.32,1933.07 ; v1(1287.4,631.1) C912.2@1309.05,619.29 ; v1(1288.19,374.02) C908.2@1290.16,374.02 ; v1(1355.32,960.63) D903.1@1369.09,946.85 ; v1(1371.26,1125) C219.2@1382.68,1094.49 ; C906.2@1379.92,806.3 v1(1391.73,857.48) ; C702.2@1387.8,1992.91 v1(1387.8,1994.88) ; v1@1417.32,661.42 v1(1417.32,663.39) ; v1(1427.17,1263.58) C217.2@1440.75,1273.62 ; v1(1490,710) 1491.07,710 1507.44,726.38 1534.65,726.38 C910.2@1537.4,729.13 ; C703.2@1495.28,1777.56 v1(1497.24,1777.56) ; C704.2@1495.28,1846.46 v1(1497.24,1846.46) ; C705.2@1503.94,2121.26 v1(1503.94,2123.23) ; v1(1537.4,902.36) C909.2@1537.4,912.2 ; U703.3@1606.3,1938.98 v1(1614.17,1948.82) ; C901.2@1635.35,820.08 v1(1635.35,822.05) ; v1(1642.52,1801.18) C312.2@1644.49,1801.18 ; v1(1691.73,884.33) C904.2@1693.7,884.33 ; C900.2@1704.25,820.08 v1(1751.97,826.77) ; v1(1728.42,2120.87) 1730.39,2122.83 C307.2@1732.28,2122.83 ; v1(1742.91,364.17) v1@1744.88,364.17 ; C1401.2@1789.37,2066.14 v1(1789.37,2081.7) ; C605.2@1789.37,2160.63 v1(1789.37,2162.6) ; v1(1795.28,1270.87) C322.2@1816.93,1268.9 ; C902.2@1801.18,1001.26 v1(1835.43,1001.97) ; C323.2@1816.93,1365.35 v1(1816.93,1367.32) ; C903.2@1829.92,874.49 v1(1830.71,826.77) ; C1400.2@1846.46,2026.38 C1400.2@1846.46,2028.35 ; v1(1846.46,2120.87) C306.2@1846.46,2122.83 ; C321.2@1874.02,1459.84 v1(1874.02,1467.72) ; v1(1897.34,2156.4) 1901.57,2160.63 C1403.2@1903.54,2160.63 ; C328.2@1960.63,2255.12 v1(1960.63,2257.09) ; C332.2@1988.19,1325.59 C332.2@1988.19,1327.56 ; C333.2@1988.19,1459.84 C333.2@1988.19,1461.81 ; C309.2@2102.36,1459.84 C309.2@2102.36,1461.81 ; v1(2118.11,2120.87) C305.2@2131.89,2122.83 ; C311.2@2167.32,1459.84 C311.2@2167.32,1461.81 ; C304.2@2174.41,2057.09 v1(2184.25,2098.43) ; v1(2234.25,2564.96) U602.2@2234.25,2566.93 ; C360.2@2272.83,2048.43 2275.59,2051.18 2275.59,2064.53 2285,2073.93 v1(2285,2075) ; v1(2303.15,2120.87) C220.2@2303.15,2122.83 ; C608.2@2331.89,2748.03 v1(2333.86,2748.03) ; C317.2@2340.55,1231.1 2340.55,1230.16 C317.2@2341.58,1229.13 ; C609.2@2360.24,2160.63 v1(2360.24,2162.6) ; C358.2@2371.26,2047.24 2374.02,2050 2374.02,2072.95 2375,2073.93 v1(2375,2075) ; v1(2411.42,886.61) C825.2@2433.07,888.58 ; v1(2470,875) 2471.07,875 2481.89,885.83 2499.21,885.83 C826.2@2501.97,888.58 ; C818.2@2498.03,784.25 2500.79,787.01 2525.94,787.01 2528.93,790 v1(2530,790) ; v1(2507.09,665.35) C817.2@2509.06,665.35 ; C1203.2@2559.05,225.59 v1(2559.06,286.61) ; v1(2561.44,949.27) 2561.44,948.2 2567.72,941.92 C813.2@2567.72,901.58 ; v1(2566.93,733.07) C819.2@2566.93,735.04 ; C1201.2@2568.9,127.17 2569.45,127.72 2569.45,154.45 v1(2570,155) ; v1(2570,1150) 2570.75,1149.25 2570.75,1141.85 2589.37,1123.23 C809.2@2590.55,1123.23 ; C810.2@2590.55,987.01 v1(2618.11,985.04) ; v1(2595.28,1188.98) C824.2@2597.24,1188.98 ; C1202.2@2637.8,127.17 v1(2637.8,142.91) ; v1(2645.67,557.87) C228.2@2645.67,559.84 ; v1(2674.02,1267.72) C823.2@2675.98,1267.72 ; v1(2680.64,705.32) 2681.39,706.08 2700.17,706.08 2702.76,708.66 U203.2@2748.03,708.66 ; v1(2693.7,1102.36) C808.2@2695.67,1129.92 ; C807.2@2693.7,1198.82 C807.2@2695.67,1198.82 ; C1200.2@2706.69,146.46 v1(2706.69,148.43) ; v1(2707.48,598.43) C227.2@2709.45,598.42 ; C816.2@2812.2,862.2 2814.25,864.25 2814.25,889.25 v1(2815,890) ; v1(2814.96,1399.61) C1001.2@2845.28,1350.39 ; C1000.2@2825.98,1281.5 2825.98,1314.92 2835,1323.93 v1(2835,1325) ; v1(2830.71,965.35) C806.2@2858.27,967.32 ; C805.2@2858.27,1103.54 v1(2885.83,1105.51) ; C822.2@2858.27,1201.97 v1(2858.27,1203.94) ; v1(2858.66,3011.81) C1301.2@2860.63,3011.81 ; v1(2858.7,2026.28) 2859.98,2027.56 C1303.2@2860.63,2027.56 ; C815.2@2910.63,862.2 2912.6,838.58 v1(2912.71,838.58) ; v1(2919.29,1174.41) C821.2@2927.16,1172.44 ; 2921.26,752.76 2921.26,754.72 ; C804.2@2927.16,967.32 v1(2974.41,980.32) C801.2@3002.76,980.32 ; v1(2933.86,1066.93) C800.2@2935.83,1066.93 ; C1002.2@2981.5,1350.39 2981.5,1400.43 2988.64,1407.57 v1(2988.64,1408.64) ; C1304.2@3007.09,2067.72 C1304.2@3007.09,2071.73 ; C1302.2@3007.09,2951.97 v1(3007.09,2953.94) ; C803.2@3034.25,897.64 v1(3036.22,897.64) ; v1(3059.84,1395.67) C1003.2@3061.81,1350.39 ; C1305.2@3095.67,2223.23 C1305.2@3095.67,2225.2 ; v1(3179.42,1664.42) 3214.57,1664.42 C1013.2@3217.32,1663.39 ; v1(3180,1515) 3180.37,1515.37 3216.95,1515.37 C1009.2@3217.32,1515.75 ; v1(3180,1585) 3180.18,1584.82 3217.15,1584.82 C1011.2@3217.32,1584.65 ; v1(3185,1445) 3185.75,1445.75 3216.23,1445.75 C1006.2@3217.32,1446.85 ; v1(3215,1345) 3215,1346.07 3217.32,1348.39 C1008.2@3217.32,1377.95 ; v1@3353.54,1446.85 v1(3355.51,1446.85) ; C1012.2@3353.54,1584.65 3353.54,1617.48 3355,1618.93 v1(3355,1620) ; C1014.2@3353.54,1663.39 v1(3355.51,1663.39) ; C1018.2@3505,1405 3519.19,1390.81 ; v1(3558.33,1538.64) 3558.33,1539.71 3562.99,1544.37 R1010.2@3562.99,1590.55 ; C1017.2@3601.57,1475.39 3604.33,1478.15 3604.33,1484.61 3607.48,1487.76 v1(3607.48,1488.82) ; v1(3710,1355) 3710,1355.67 3733.46,1379.13 C1020.2@3733.46,1380.91 ; v1(3710,1735) 3711.07,1735 3714.77,1731.3 C1015.2@3752.76,1731.3 ; v1(3750.69,1405.69) 3750.69,1406.75 3752.76,1408.82 3752.76,1445.87 C1019.2@3752.76,1449.8
  other v1: 813.98,141.73 853.35,141.73 892.72,141.73 347.44,165.35 664.37,165.35 813.98,181.1 853.35,181.1 892.72,181.1 347.44,204.72 664.37,204.72 1568.7,246.06 347.44,271.65 664.37,271.65 1568.7,285.43 2050,310 2205,310 2440,310 347.44,311.02 664.37,311.02 2320,315 3972.44,390.16 4011.81,390.16 813.98,437.01 853.35,437.01 892.72,437.01 813.98,476.38 853.35,476.38 892.72,476.38 851.38,696.85 851.38,736.22 3629.72,747.05 3669.09,747.05 1791.34,748.03 1830.71,748.03 1235.43,777.56 1168.31,787.4 1751.97,787.4 1791.34,787.4 1830.71,787.4 851.38,807.09 1168.31,826.77 1791.34,826.77 851.38,846.46 692.91,880.91 732.28,880.91 381.89,884.84 421.26,884.84 2665.35,937.01 2704.72,937.01 2744.09,937.01 2783.46,937.01 2665.35,976.38 2704.72,976.38 2744.09,976.38 2783.46,976.38 2665.35,1015.75 2704.72,1015.75 2744.09,1015.75 2783.46,1015.75 2665.35,1055.12 2704.72,1055.12 2744.09,1055.12 2783.46,1055.12 3041.34,1066.93 1267.72,1077.56 535.43,1103.74 574.8,1103.74 614.17,1103.74 3090,1130 535.43,1143.11 574.8,1143.11 614.17,1143.11 1100.2,1157.48 1535.43,1161.42 1574.8,1161.42 1614.17,1161.42 535.43,1182.48 574.8,1182.48 614.17,1182.48 1535.43,1200.79 1574.8,1200.79 1614.17,1200.79 1574.8,1240.16 1614.17,1240.16 354.33,1244.09 843.5,1256.89 1299.21,1259.84 936.02,1262.6 170.47,1273.62 354.33,1283.46 843.5,1296.26 1566.93,1421.06 2942.91,1486.22 3001.97,1486.22 3061.02,1486.22 3120.08,1486.22 667.32,1492.13 700.56,1492.13 2942.91,1545.28 3001.97,1545.28 3061.02,1545.28 3120.08,1545.28 2689.76,1565.94 2942.91,1604.33 3001.97,1604.33 3061.02,1604.33 3120.08,1604.33 1140,1608.35 2942.91,1663.39 3001.97,1663.39 3061.02,1663.39 3120.08,1663.39 402.17,1797.24 441.54,1797.24 402.17,1836.61 441.54,1836.61 3140,1945 3855,1945 3151.34,2100.61 3535,2165 3669.29,2421.26 3708.66,2421.26 3748.03,2421.26 3669.29,2460.63 3748.03,2460.63 3669.29,2500 3708.66,2500 3748.03,2500 3519.88,2598.43 2651.77,2927.17 2691.14,2927.17 2908.86,2960.63 3519.88,2960.63 3519.88,3000 4202.76,3023.62 4242.13,3023.62 4281.5,3023.62 3946.85,3055.12 3986.22,3055.12 4025.59,3055.12
HAT_ID_WP: R1432.2 TP1400.1 U1400.7 | length 84
  L1_TOP w5.91: U1400.7@1767.72,2709.65 1831.88,2709.65 1844.67,2696.85 R1432.2@1846.46,2696.85
HDMI_CONN_CEC: J1000.13 U1001.7 | length 539.1
  L1_TOP w5.91: U1001.7@3445.83,1512.2 3505.13,1512.2 3512.34,1505 v3(3515,1505) ; v3(3806.57,1408.77) 3819.67,1395.67 J1000.13@3936.22,1395.67
  L3_SIG w5.91: v3(3515,1505) 3599.99,1505 3600.55,1505.56 3614.41,1505.56 3614.97,1505 3710.34,1505 v3(3806.57,1408.77)
HDMI_CONN_HPD: J1000.19 U1001.10 | length 657.3
  L1_TOP w5.91: U1001.10@3445.83,1435.43 3496.22,1435.43 v3(3497.33,1436.54) ; v3(3736.78,1319.56) 3778.78,1277.56 J1000.19@3936.22,1277.56
  L3_SIG w5.91: v3(3497.33,1436.54) 3460,1399.21 3460,1355 3495.44,1319.56 v3(3736.78,1319.56)
HDMI_CT_CP_HPD: R1009.1 U1.R20 U1001.12 | length 111.2
  L1_TOP w3.54: v2(2145.67,1673.23) U1.R20@2155.51,1663.39
  L1_TOP w5.91: U1001.12@3445.83,1384.25 3451.73,1378.35 3502.56,1378.35 v3(3502.95,1377.95)
  L8_BOT w5.91: R1009.1@3495,1343.7 3495,1367.34 3502.95,1375.29 v3(3502.95,1377.95)
HDMI_DDC_SCL: J1000.15 U1001.8 | length 525.9
  L1_TOP w5.91: U1001.8@3464.33,1486.61 3465.13,1485.81 3514.19,1485.81 v3(3515,1485) ; v3(3825.43,1379.77) 3848.9,1356.3 J1000.15@3936.22,1356.3
  L3_SIG w5.91: v3(3515,1485) 3515.88,1485 3558.58,1442.3 3752.16,1442.3 3800.45,1394 3811.2,1394 v3(3825.43,1379.77)
HDMI_DDC_SDA: J1000.16 U1001.9 | length 545.3
  L1_TOP w5.91: U1001.9@3445.83,1461.02 3447.92,1463.12 3513.12,1463.12 v3(3515,1465) ; v3(3828.08,1351.96) 3843.42,1336.61 J1000.16@3936.22,1336.61
  L3_SIG w5.91: v3(3515,1465) 3537.18,1444.69 cw(c3525.88,1432.35) 3539.3,1442.34 3544.08,1435.92 3547.54,1432.46 3549.99,1432.46 3747.58,1432.46 v3(3828.08,1351.96)
HDMI_HPD: R1011.1 U1.R21 U1001.4 | length 13.9
  L1_TOP w3.54: U1.R21@2175.2,1663.39 v2(2185.04,1653.54)
HDMI_LS_OE: R1010.1 U1.T21 U1001.5 | length 13.9
  L1_TOP w3.54: U1.T21@2175.2,1643.7 v2(2185.04,1633.86)
HDMI_PD_N: R1006.1 U1.T22 U1000.10 | length 148.1
  L1_TOP w3.54: U1.T22@2194.88,1643.7 v2(2204.72,1633.86)
  L1_TOP w5.12: U1000.10@3061.02,1350.39 3064.13,1347.29 3064.13,1320.87 3071.26,1313.74 3071.26,1306.71 3110.93,1267.05 3111.65,1267.05 R1006.1@3132.5,1246.2
HDMI_SHELL: FB1003.1 J1000.20 J1000.21 J1000.22 J1000.23 | length 1121.9
  L1_TOP w5.12: J1000.21@3966.14,1169.29 J1000.23@4200.79,1169.29 J1000.22@4200.79,1740.16 J1000.20@3966.14,1740.16 FB1003.1@3966.14,1821.85
HDMI_TX0_N: J1000.9 U1000.24 U1001.17 | length 1002.7
  L1_TOP w5.12: U1000.24@3255.91,1564.96 3259.01,1568.06 3285.69,1568.06 3285.87,1568.24 3343.72,1568.24 3350,1561.96 3350,1536.45 3371.88,1514.57 3371.88,1393.21 3428.21,1336.88 3520.43,1336.88 3528.12,1344.57 3528.12,1345.26 3563.12,1380.26 3563.12,1467.57 3600.71,1505.16 3619.22,1505.16 3631.53,1492.85 3667.94,1492.85 U1001.17@3674.17,1486.61 3680.41,1492.85 3766.95,1492.85 3772.27,1487.54 3862.59,1487.54 3875.71,1474.41 J1000.9@3936.22,1474.41
HDMI_TX0_P: J1000.7 U1000.25 U1001.18 | length 1002.7
  L1_TOP w5.12: U1000.25@3255.91,1584.65 3259.01,1581.54 3285.69,1581.54 3285.87,1581.36 3349.15,1581.36 3363.12,1567.4 3363.12,1541.88 3385,1520 3385,1398.65 3433.65,1350 3515,1350 3515,1350.69 3550,1385.69 3550,1473 3595.28,1518.28 3624.66,1518.28 3636.97,1505.97 3667.94,1505.97 U1001.18@3674.17,1512.2 3680.41,1505.97 3772.39,1505.97 3777.7,1500.65 3862.59,1500.65 3875.71,1513.78 J1000.7@3936.22,1513.78
HDMI_TX1_N: J1000.6 U1000.27 U1001.20 | length 774
  L1_TOP w4.69: U1000.27@3255.91,1624.02 3299.64,1624.02 3329.7,1654.08 3329.7,1660.38 3348.83,1679.51 3413.46,1679.51 3414.84,1680.89 3482.63,1680.89 3593.69,1569.84 3667.72,1569.84 U1001.20@3674.17,1563.39 3680.62,1569.84 3766.04,1569.84 3789.07,1546.8 3877.6,1546.8 3890.94,1533.46 J1000.6@3936.22,1533.46
HDMI_TX1_P: J1000.4 U1000.28 U1001.21 | length 773.4
  L1_TOP w4.69: U1000.28@3255.91,1643.7 3259.09,1640.52 3289.79,1640.52 3291.65,1638.66 3296.34,1638.66 3317.01,1659.33 3317.01,1662.39 3346.82,1692.2 3408.2,1692.2 3409.58,1693.58 3487.89,1693.58 3598.94,1582.53 3667.72,1582.53 U1001.21@3674.17,1588.98 3680.62,1582.53 3771.29,1582.53 3794.33,1559.49 3877.6,1559.49 3890.94,1572.83 J1000.4@3936.22,1572.83
HDMI_TX2_N: J1000.3 U1000.30 U1001.22 | length 745.9
  L1_TOP w5.12: U1000.30@3255.91,1683.07 3259.01,1686.17 3285.69,1686.17 3285.87,1686.35 3328.47,1686.35 3352.84,1710.72 3490.72,1710.72 3580.65,1620.8 3667.94,1620.8 U1001.22@3674.17,1614.57 3680.41,1620.8 3769.9,1620.8 3785.06,1605.65 3877.82,1605.65 3890.94,1592.52 J1000.3@3936.22,1592.52
HDMI_TX2_P: J1000.1 U1000.31 U1001.23 | length 745.9
  L1_TOP w5.12: U1000.31@3255.91,1702.76 3259.01,1699.65 3285.69,1699.65 3285.87,1699.47 3323.04,1699.47 3347.41,1723.84 3496.16,1723.84 3500,1720 3586.08,1633.92 3667.94,1633.92 U1001.23@3674.17,1640.16 3680.41,1633.92 3775.34,1633.92 3790.5,1618.76 3877.82,1618.76 3890.94,1631.89 J1000.1@3936.22,1631.89
HDMI_TXC_N: J1000.12 U1000.21 U1001.15 | length 918.9
  L1_TOP w5.12: U1000.21@3255.91,1505.91 3259.01,1509.01 3285.69,1509.01 3285.87,1509.19 3310.81,1509.19 3320.54,1499.46 3320.54,1413.2 3355,1378.74 3355,1354.57 3403.41,1306.16 3526.16,1306.16 3615,1395 3615,1422.69 3633.98,1441.67 3667.94,1441.67 U1001.15@3674.17,1435.43 3680.41,1441.67 3755.33,1441.67 3768.52,1428.48 3862.59,1428.48 3875.71,1415.35 J1000.12@3936.22,1415.35
HDMI_TXC_P: J1000.10 U1000.22 U1001.16 | length 918.9
  L1_TOP w5.12: U1000.22@3255.91,1525.59 3259.01,1522.49 3285.69,1522.49 3285.87,1522.31 3316.24,1522.31 3329.28,1509.28 3333.66,1504.89 3333.66,1418.63 3368.12,1384.17 3368.12,1360 3408.84,1319.28 3520.72,1319.28 3601.88,1400.43 3601.88,1428.12 3628.54,1454.79 3667.94,1454.79 U1001.16@3674.17,1461.02 3680.41,1454.79 3760.76,1454.79 3773.95,1441.6 3862.59,1441.6 3875.71,1454.72 J1000.10@3936.22,1454.72
HDR3_I2C1_SDA: C1400.1 R1424.1 U1.B7 | length 205.1
  L1_TOP w3.94: v3(1875,2055) 1903.87,2026.13 1903.87,1997.37 1889.17,1982.67 1889.17,1958.07 1889.37,1957.87 1889.37,1929.53 U1.B7@1899.61,1919.29
  L8_BOT w5.91: C1400.1@1846.46,2066.14 1849.04,2068.72 1872.42,2068.72 R1424.1@1875,2071.3 v3(1875,2055)
HDR5_I2C1_SCL: C1401.1 R1425.1 U1.A7 | length 227.5
  L1_TOP w3.54: U1.A7@1899.61,1938.98 v2(1899.61,1978.35)
  L8_BOT w5.91: R1425.1@1732.28,2028.54 1732.38,2028.44 1789.27,2028.44 C1401.1@1789.37,2028.35 1790.55,2028.35 1818.9,2000 1834.06,1984.84 1880.92,1984.84 1886.67,1979.1 1898.85,1979.1 v2(1899.61,1978.35)
HDR7_GPIO4_GPCLK: R1400.1 U1.D16 | length 2261.7
  L1_TOP w3.54: U1.D16@2076.77,1879.92 v2(2086.61,1870.08)
  L6_SIG w3.54: v2(2086.61,1870.08) 2163.19,1946.65 2163.19,1983.21 2172.35,1992.38 2172.35,2000
  L6_SIG w5.91: v3(664.92,2868.62) 1372.76,2868.62 2011.38,2230 2035,2230 2064.58,2200.42 2136.48,2176.99 2195.35,2118.11 2247.95,2089.73 cw(c2240,2075) 2255.95,2069.95 2254.72,2066.05 2247.9,2048.25 2232.65,2033 2189.33,2033 2172.35,2016.03 2172.35,2000
  L8_BOT w5.91: R1400.1@629.53,2867.13 663.42,2867.13 v3(664.92,2868.62)
HDR8_UART_TXD: R1412.1 U1.A11 | length 1902.5
  L1_TOP w3.54: U1.A11@1978.35,1938.98 1978.35,1978.35
  L1_TOP w5.91: 1978.35,1978.35 1978.35,1991.65 1970,2000 1970,2056.36 v3(1984.18,2070.54)
  L3_SIG w5.91: v3(665,2775) 821.89,2618.11 1091.89,2618.11 1325,2385 1325,2350.49 1520.67,2154.82 1520.67,2104.09 1629.76,1995 1700,1995 1740.71,2035.71 1773.35,2035.71 1775.32,2037.68 1790.2,2037.68 1797.81,2045.28 1819.08,2045.28 1819.34,2045.55 1828.05,2045.55 1849.31,2066.81 1865.93,2066.81 1868.88,2069.76 1881.12,2069.76 1882.34,2068.54 1891.18,2068.54 1933.2,2065.46 ccw(c1935,2090) 1944.47,2067.29 1951.73,2070.31 1968.15,2070.31 v3(1984.18,2070.54)
  L8_BOT w5.91: R1412.1@629.53,2778.54 658.79,2778.54 662.34,2775 v3(665,2775)
HDR10_UART_RXD: R1413.1 R1433.2 U1.B11 | length 2359.9
  L1_TOP w3.54: 1968.5,1978.35 1968.5,1929.13 U1.B11@1978.35,1919.29
  L1_TOP w5.91: 1968.5,1978.35 1968.5,1988.13 1960.16,1996.48 1960.16,2000 1960.16,2067.4 1978.88,2086.13 1988.3,2086.13 1988.79,2085.63 2025.63,2085.63 2033.58,2093.58 2033.58,2097.76 2045,2109.18 2045,2118.11 2045,2130 2100,2185 2175,2185 2180,2180 2245,2180 2251.2,2186.2 2251.2,2235.5 v3(2303.2,2287.51)
  L3_SIG w5.91: v3(740,2765) 1066.79,2765 1530.56,2301.23 1530.56,2219.79 1530.83,2219.53 1530.83,2218.34 1703.62,2045.55 1769.27,2045.55 1778.85,2055.13 1815,2055.13 1824.87,2065 1833.58,2065 1847,2078.43 1847.34,2078.77 1864.81,2079.61 1885.19,2079.61 1933.69,2075.29 ccw(c1935,2090) 1942.2,2077.11 1947.65,2080.16 1964.08,2080.16 1964.56,2080.64 1973.4,2080.64 1974.75,2081.99 1976.07,2083.31 ccw(c1975.18,2089.15) 1977.72,2083.82 cw(c1984.18,2070.54) 1991.59,2083.31 2018.31,2083.31 v3(2045,2110)
  L8_BOT w3.94: R1413.1@729.53,2778.54 729.53,2778.2 740,2767.72 v3(740,2765)
  L8_BOT w5.91: v3(2303.2,2287.51) R1433.2@2303.15,2312.01
HDR11_GPIO17: R1401.1 U1.G25 | length 13.9
  L1_TOP w3.54: v2(2244.09,1811.02) U1.G25@2253.94,1820.87
HDR12_GPIO18_PCM_CLK: R1414.1 U1.A18 | length 39.4
  L1_TOP w3.54: U1.A18@2116.14,1938.98 2116.14,1978.35
HDR13_GPIO27: R1402.1 U1.F25 | length 13.9
  L1_TOP w3.54: U1.F25@2253.94,1840.55 v2(2263.78,1850.39)
HDR15_GPIO22: R1403.1 U1.A9 | length 39.4
  L1_TOP w3.54: U1.A9@1938.98,1938.98 1938.98,1959.66 1938.98,1978.35
HDR16_GPIO23: R1415.1 U1.L26 | length 13.9
  L1_TOP w3.54: U1.L26@2273.62,1742.13 v2(2283.46,1751.97)
HDR18_GPIO24: R1416.1 U1.K26 | length 13.9
  L1_TOP w3.54: v2(2263.78,1751.97) U1.K26@2273.62,1761.81
HDR19_SPI0_MOSI: R1404.1 U1.D12 | length 13.9
  L1_TOP w3.54: U1.D12@1998.03,1879.92 v2(2007.87,1870.08)
HDR21_SPI0_MISO: R1405.1 U1.C12 | length 13.9
  L1_TOP w3.54: U1.C12@1998.03,1899.61 v2(2007.87,1889.76)
HDR22_GPIO25: R1417.1 U1.B9 | length 64.3
  L1_TOP w3.54: 1931.89,1978.35 1931.89,1962.6 1929.13,1959.84 1929.13,1929.13 U1.B9@1938.98,1919.29
HDR23_SPI0_SCLK: R1406.1 U1.C11 | length 13.9
  L1_TOP w3.54: v2(1968.5,1909.45) U1.C11@1978.35,1899.61
HDR24_SPI0_CE0_N: R1418.1 U1.D13 | length 13.9
  L1_TOP w3.54: U1.D13@2017.72,1879.92 v2(2027.56,1870.08)
HDR26_SPI0_CE1_N: R1419.1 U1.C13 | length 13.9
  L1_TOP w3.54: v2(2007.87,1909.45) U1.C13@2017.72,1899.61
HDR27_ID_SD: C1402.1 R1426.1 U1.B8 | length 152.4
  L1_TOP w3.54: U1.B8@1919.29,1919.29 1909.84,1928.74 1909.84,1985.84 1920.45,1996.45 1920.45,2000
  L1_TOP w5.91: 1920.45,2000 1920.45,2009.26 v3(1922.34,2011.15)
  L8_BOT w5.91: C1402.1@1903.54,2028.35 1904.93,2028.35 1922.13,2011.15 v3(1922.34,2011.15) 1924.22,2013.03 1924.22,2020.7 1934.81,2031.3 R1426.1@1935,2031.3